# Altium PCB STEP_DRIVER_V3.0.PcbDoc (part 4 of 5)
Units mm, origin at the board's own origin, x right, y up, seen from the top; angles counter-clockwise.
Board outline 245.25 x 200.25 mm, 2 copper layers (Top Layer, Bottom Layer), stack 1.371 mm thick; 477 components, 170 nets, 1104 pads, 876 vias.
Unrouted connection lines stored in the file: 4.
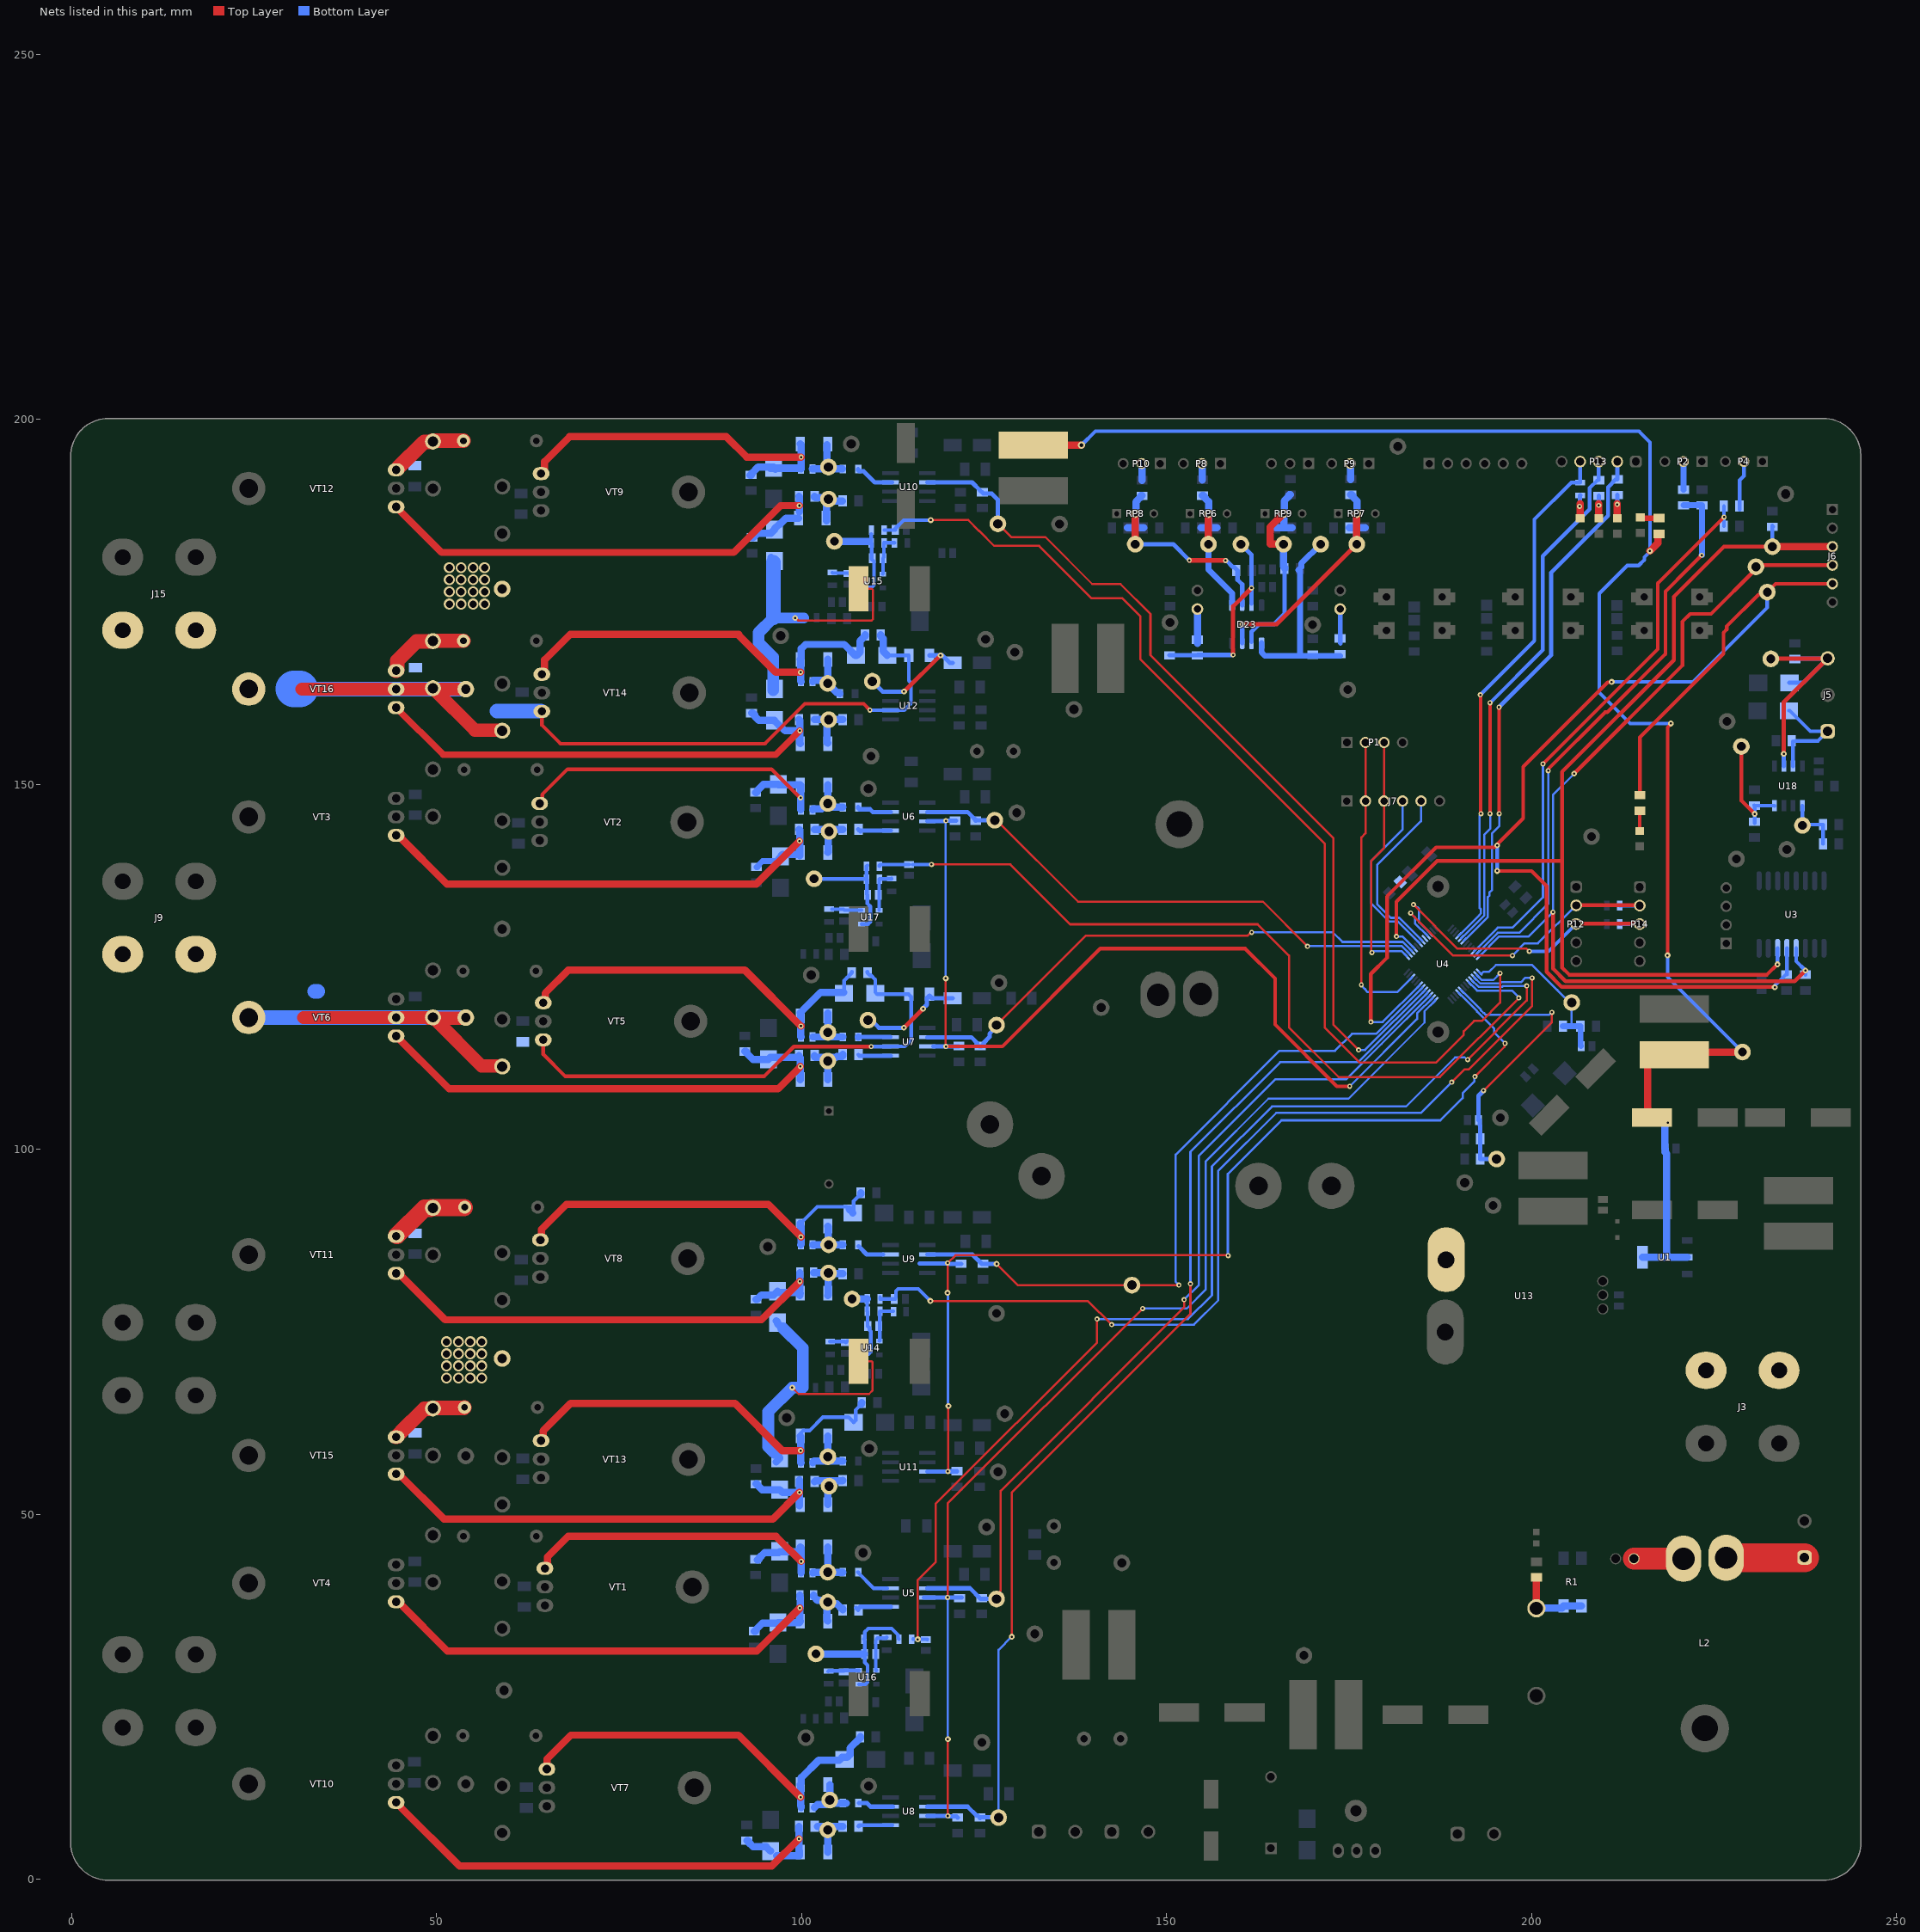
[diagram p3: the nets of this part, all layers, seen from the top]

## Via types
v1: diameter 0.7/0.7 (per signal layer), hole 0.3, Top Layer to Bottom Layer, tented both sides, 388 vias
v2: diameter 1.5/0.7 (per signal layer), hole 1, Top Layer to Bottom Layer, tented both sides, 206 vias
v3: diameter 0.8, hole 0.3, Top Layer to Bottom Layer, tented both sides, 99 vias
v4: diameter 1.5, hole 1, Top Layer to Bottom Layer, 96 vias
v5: diameter 0.5, hole 0.254, Top Layer to Bottom Layer, tented both sides, 42 vias
v6: diameter 1.27, hole 0.711, Top Layer to Bottom Layer, tented both sides, 22 vias
v7: diameter 1.27, hole 0.711, Top Layer to Bottom Layer, 17 vias
v8: diameter 1.27, hole 0.711, Top Layer to Bottom Layer, tented top, 2 vias
v9: diameter 1, hole 0.5, Top Layer to Bottom Layer, 2 vias
v10: diameter 0.7, hole 0.254, Top Layer to Bottom Layer, tented both sides, 2 vias

## Nets (pads, with @x,y where several pads share a name; then routed paths per layer and width w, separated by ;. In a path a pad name is that pad's centre, name@x,y a point inside that pad or via, vN(x,y) a via of type N, cw(c..) or ccw(c..) an arc to the next point about the centre after c; other vN are vias at no path point) (continued)
NetC37_1: C37.1 C79.1 C83.2 J15.2 R139.1 TP64.1 U12.6 VD13.1 VD15.2 VT14.S VT16.D ZD14.1 | length 133.3
  Top Layer w0.5: VT14.S@64.417,160.006 64.44,159.983 64.44,158.11 66.975,155.575 94.983,155.575 100.445,161.037 108.506,161.037 v1(109.368,160.175)
  Top Layer w1: VT14.S@64.417,160.006 VT14.S@64.417,160.006
  Top Layer w1.8: 31.576,163.054 VT16.D@44.451,163.054 VD15.2@49.621,163.054 ; VD15.2@49.5,163.175 VD15.2@49.621,163.054 ; TP64.1@54,163.054 VD15.2@49.621,163.054 ; VD13.1@59,157.35 58.923,157.427 55.248,157.427 VD15.2@49.621,163.054
  Bottom Layer w0.5: v1(109.368,160.175) U12.6@112.204,160.175 114.083,160.175 114.997,161.089 114.997,163.907 114.697,164.207 C37.1@114.697,167.675 ZD14.1@111.75,167.675
  Bottom Layer w1: R139.1@110.819,170.475 110.819,170.324 111.189,169.954 111.189,168.236 ZD14.1@111.75,167.675
  Bottom Layer w2: 31.264,163.054 VT16.D@44.451,163.054 TP64.1@54,163.054 ; 58.262,160.067 VT14.S@64.274,160.067
  Bottom Layer w5: 30.444,163.054 31.264,163.054
NetC37_2: C37.2 D20.1 TP58.1 U12.8 | length 15.6
  Top Layer w0.6: v3(114.047,162.715) 114.065,162.715 119.025,167.675 v3(119.043,167.675)
  Bottom Layer w0.6: TP58.1@109.693,164.125 111.103,162.715 U12.8@112.204,162.715 v3(114.047,162.715) ; C37.2@117.547,167.675 v3(119.043,167.675) 119.295,167.675 120.318,166.652 D20.1@120.718,166.652
NetC41_1: C41.1 C70.1 C72.2 J9.2 R133.1 TP40.1 U7.6 VD6.1 VD8.2 VT5.S VT6.D ZD6.1 | length 134.5
  Top Layer w0.5: VT5.S@64.617,115.006 64.617,113.008 67.625,110 94.87,110 98.945,114.075 v1(109.543,114.075)
  Top Layer w1.8: 31.776,118.054 VT6.D@44.451,118.054 VD8.2@48.825,118.054 ; VD8.2@48.875,117.979 VD8.2@49.596,117.979 ; VD8.2@49.5,118.075 VD8.2@49.596,117.979 ; TP40.1@54.055,117.979 VD8.2@49.596,117.979 ; VD6.1@59,111.35 58.923,111.427 56.148,111.427 VD8.2@49.596,117.979
  Bottom Layer w0.5: R133.1@109.001,124.35 109.001,124.199 109.354,123.846 109.505,123.846 110.1,123.251 ZD6.1@110.1,121.521 ; v1(109.543,114.075) 109.552,114.084 112.195,114.084 U7.6@112.204,114.094 114.134,114.094 115.023,114.982 115.023,120.897 C41.1@114.672,121.248 110.374,121.248 ZD6.1@110.237,121.385
  Bottom Layer w2: VT6.D@24.284,118.028 VT6.D@44.308,118.028 ; 33.314,121.629 33.726,121.629 ; VT6.D@44.472,118.075 C72.2@47.068,118.075 ; C72.2@47.078,118.075 VD8.2@49.5,118.075 ; VD8.2@49.5,118.054 TP40.1@54,118.054
NetC41_2: C41.2 D6.1 TP34.1 U7.8 | length 14.6
  Top Layer w0.6: v3(114.022,116.655) 114.038,116.655 116.633,119.25 v3(116.648,119.25)
  Bottom Layer w0.6: TP34.1@109.093,117.702 109.549,117.702 110.596,116.655 112.183,116.655 U7.8@112.204,116.634 112.215,116.644 114.011,116.644 v3(114.022,116.655) ; v3(116.648,119.25) 116.648,119.304 117.172,119.828 117.172,120.698 117.522,121.048 117.872,120.698 D6.1@120.718,120.698
NetC43_2: C43.2 R53.1 R55.2 TP4.1 U4.13 | length 24.1
  Bottom Layer w0.3: U4.13@192.838,124.299 193.114,124.022 193.117,124.022 193.393,124.299 194.171,124.299 195.122,125.25 200.093,125.25 202.468,122.875 203.518,121.825 TP4.1@205.615,119.728 ; 205.517,116.875 205.517,119.728 TP4.1@205.517,120.125
  Bottom Layer w0.8: R53.1@204.294,116.875 205.517,116.875 206.717,116.875 C43.2@206.717,114.811 ; C43.2@206.718,114.81 206.718,114.226 C43.2@206.793,114.151
NetC44_2: C44.2 R54.1 R56.2 TP5.1 U4.20 | length 40.8
  Top Layer w0.3: v1(193.436,108.058) 202.793,117.415 v1(202.793,118.765)
  Bottom Layer w0.3: U4.20@190.363,121.824 193.038,119.148 193.038,119.067 193.436,118.669 193.518,118.669 193.757,118.429 202.417,118.429 202.753,118.765 v1(202.793,118.765)
  Bottom Layer w0.6: C44.2@192.741,104 C44.2@192.753,104.013 ; C44.2@192.741,104.013 C44.2@192.753,104.013 ; v1(193.436,108.058) 193.436,108.031 192.741,107.336 192.741,104.175 C44.2@192.903,104.013 ; TP5.1@195.229,98.675 192.969,98.675 192.966,98.678 192.966,101.422 192.969,101.425 192.969,103.274 192.916,103.327 192.916,104 C44.2@192.903,104.013 ; C44.2@192.753,104.013 C44.2@192.903,104.013
NetC46_1: C46.1 R69.1 U16.3 | length 4.3
  Bottom Layer w0.5: R69.1@103.655,28.479 103.718,28.542 105.792,28.542 105.855,28.605 105.858,28.603 107.852,28.603 U16.3@107.855,28.6
NetC47_1: C47.1 R70.2 R144.1 U16.4 | length 5.6
  Bottom Layer w0.5: R70.2@110.155,32.628 C47.1@110.155,30.831 110.155,28.675 110.23,28.6 U16.4@110.255,28.6 ; R70.2@110.281,32.9 110.406,33.026 111.542,33.026 R144.1@111.668,33.151
NetC47_2: C47.2 R70.1 R147.2 TP77.1 U16.1 | length 20.5
  Bottom Layer w0.5: TP77.1@101.969,30.875 TP77.1@101.991,30.853 ; U16.1@107.855,26.7 108.762,26.7 109.055,26.993 109.055,29.312 108.657,29.71 C47.2@108.657,30.4 ; R70.1@108.529,32.9 108.657,33.028 108.657,33.866 109.142,34.351 112.352,34.351 113.216,33.487 113.216,33.028 R147.2@113.344,32.9 ; C47.2@108.633,30.853 C47.2@108.655,30.831 ; C47.2@108.655,30.541 C47.2@108.655,30.831 ; R70.1@108.655,32.628 C47.2@108.655,30.831
  Bottom Layer w1: TP77.1@101.991,30.853 C47.2@108.633,30.853
NetC49_1: C49.1 R71.1 U17.3 | length 4.1
  Bottom Layer w0.5: R71.1@104.156,132.895 105.732,132.895 C49.1@105.852,132.775 ; C49.1@105.852,132.773 U17.3@108.227,132.773
NetC50_1: C50.1 R72.2 R143.1 U17.4 | length 6
  Bottom Layer w0.5: U17.4@110.627,132.773 110.64,132.786 110.64,137.006 R72.2@110.654,137.02 110.692,137.057 112.309,137.057 R143.1@112.347,137.095
NetC50_2: C50.2 R72.1 R148.2 TP76.1 U17.1 | length 16.5
  Bottom Layer w0.5: TP76.1@101.718,137.047 108.875,137.047 R72.1@108.901,137.021 ; U17.1@108.227,130.873 109.134,130.873 109.427,131.165 109.427,133.272 109.028,133.671 C50.2@109.028,134.869 108.965,134.932 108.965,136.957 R72.1@108.902,137.02 R72.1@108.901,137.021 ; R148.2@109.027,138.903 R148.2@108.899,138.775 108.901,138.773 R72.1@108.901,137.021
NetC51_1: C51.1 R73.1 U14.3 | length 4.5
  Bottom Layer w0.5: R73.1@103.897,73.676 105.947,73.676 C51.1@106.072,73.55 ; C51.1@106.072,73.555 106.268,73.75 U14.3@108.272,73.75
NetC52_1: C52.1 R62.1 R76.2 U14.4 | length 5.9
  Bottom Layer w0.5: U14.4@110.672,73.75 110.71,73.788 110.71,77.784 R76.2@110.748,77.822 R62.1@112.589,77.822
NetC52_2: C52.2 R76.1 R146.2 TP75.1 U14.1 | length 10.9
  Bottom Layer w0.3: R76.1@108.997,77.822 R76.1@108.998,77.823 ; R146.2@108.998,79.499 R146.2@108.999,79.5
  Bottom Layer w0.5: U14.1@108.272,71.85 108.347,71.925 109.18,71.925 109.472,72.218 109.472,75.047 109.297,75.222 109.297,75.547 C52.2@109.072,75.772 109.035,75.81 109.035,77.784 R76.1@108.997,77.822 ; R76.1@108.998,77.823 R146.2@108.998,79.499
  Bottom Layer w1: TP75.1@106.922,79.5 R146.2@108.999,79.5
NetC53_1: C53.1 R74.1 U15.3 | length 4.6
  Bottom Layer w0.5: R74.1@104.218,179.023 104.281,178.961 106.355,178.961 C53.1@106.418,178.898 108.518,178.898 108.593,178.823 U15.3@108.718,178.823
NetC54_1: C54.1 R77.2 R120.1 U15.4 | length 5.8
  Bottom Layer w0.5: U15.4@111.118,178.823 111.168,178.873 C54.1@111.168,180.993 111.294,181.119 R77.2@111.294,183.093 R120.1@112.717,183.093
NetC54_2: C54.2 R77.1 R145.2 TP74.1 U15.1 | length 13.7
  Bottom Layer w0.3: R77.1@109.335,183.3 R77.1@109.542,183.093
  Bottom Layer w0.5: U15.1@108.718,176.923 108.793,176.998 109.627,176.998 109.92,177.29 109.92,180.54 109.605,180.856 109.605,183.03 R77.1@109.542,183.093 R145.2@109.542,184.319
  Bottom Layer w1: TP74.1@104.501,183.3 R77.1@109.335,183.3
NetC75_2: C75.2 C77.1 C82.2 C84.1 R64.2 R108.2 TP67.1 VD11.1 VD16.1 VT11.S VT15.S ZD13.1 ZD17.1 | length 63.8
  Top Layer w0.3: v3(98.727,67.35) 99.593,66.484 109.252,66.484 109.747,66.979 109.747,70.799 109.572,70.975 R64.2@107.8,70.975
  Top Layer w2: VT15.S@44.451,60.594 44.483,60.594 45.094,61.205 45.094,61.237 48.323,64.466 49.237,64.466 VD16.1@49.34,64.569 ; VD11.1@49.183,91.937 VD11.1@49.271,92.025 ; VD16.1@49.348,64.577 53.752,64.577 C75.2@53.825,64.65 ; C82.2@53.8,92.025 C82.2@53.85,92.075
  Top Layer w2.4: VT11.S@44.594,88.205 48.326,91.937 VD11.1@49.183,91.937 ; VD11.1@49.271,92.025 C82.2@53.8,92.025
  Bottom Layer w1: ZD17.1@96.275,58.423 96.375,58.423 97.025,57.773 ZD17.1@97.025,57.673 ZD17.1@96.514,57.162 ; ZD13.1@96.55,76.5 96.7,76.35 96.7,76.15 97.35,75.5 ZD13.1@97.45,75.5 ; R108.2@100.163,67.35 R108.2@100.167,67.354
  Bottom Layer w1.6: ZD17.1@96.275,58.423 95.439,59.258 95.439,64.062 v3(98.727,67.35) R108.2@100.163,67.35 ; ZD13.1@97.45,75.5 100.167,72.783 R108.2@100.167,67.504
  other v2: 51.368,68.657 52.993,68.657 54.618,68.657 56.193,68.657 51.368,70.332 52.993,70.332 54.618,70.332 56.193,70.332 51.368,71.982 52.993,71.982 54.618,71.982 56.193,71.982 51.368,73.632 52.993,73.632 54.618,73.632 56.193,73.632
NetC76_2: C76.2 C78.1 C80.2 C83.1 R63.2 R110.2 TP68.1 VD12.1 VD15.1 VT12.S VT16.S ZD12.1 ZD16.1 | length 63.8
  Top Layer w0.3: v3(99.118,172.804) 99.198,172.804 99.544,172.458 109.602,172.458 109.778,172.634 109.778,176.637 109.602,176.812 R63.2@107.8,176.812
  Top Layer w2: VT16.S@44.451,165.594 44.483,165.594 44.594,165.705 44.594,166.919 47.262,169.587 49.408,169.587 49.466,169.646 49.466,169.675 C76.2@53.675,169.675 ; VT12.S@44.594,193.205 44.705,193.316 44.705,193.348 48.294,196.937 49.237,196.937 VD12.1@49.275,196.975 ; VD12.1@49.34,197.04 49.367,197.013 49.429,197.075 C80.2@53.675,197.075
  Bottom Layer w1: ZD12.1@95.804,181.096 ZD12.1@96.3,180.6 ZD12.1@96.125,180.425 ; ZD16.1@96.125,162.889 ZD16.1@96.318,163.082
  Bottom Layer w1.5: 96.125,172.804 v3(99.118,172.804) R110.2@100.292,172.804
  Bottom Layer w1.6: ZD16.1@96.125,162.889 96.125,167.425 94.098,169.452 94.098,170.777 96.125,172.804
  Bottom Layer w2: 96.125,172.804 ZD12.1@96.125,180.425
  other v2: 51.743,174.7 53.368,174.7 54.993,174.7 56.568,174.7 51.743,176.375 53.368,176.375 54.993,176.375 56.568,176.375 51.743,178.025 53.368,178.025 54.993,178.025 56.568,178.025 51.743,179.675 53.368,179.675 54.993,179.675 56.568,179.675
NetC91_1: C91.1 C92.1 L5.1 L9.1 R57.2 TP72.1 U1.2 U1.4 | length 237.4
  Top Layer w0.3: L5.1@220.414,112.111 L5.1@221.064,111.461
  Top Layer w0.5: v3(218.65,126.579) 218.65,157.819 219.1,158.269 v3(219.1,158.35)
  Top Layer w1: L9.1@131.754,196.478 v9(138.354,196.478) ; C91.1@215.577,105.175 C91.1@215.917,105.175 ; L5.1@215.9,113.864 215.9,105.192 C91.1@215.917,105.175 ; C91.1@216.066,103.865 C91.1@216.646,104.445 ; C91.1@216.175,104 C91.1@216.175,104.445 ; v3(216.229,181.971) 217.306,183.048 217.306,184.246 217.384,184.324 R57.2@217.483,184.324 ; C91.1@216.35,105.175 C91.1@215.917,105.175 ; C91.1@216.802,105.05 C91.1@217.272,104.92 ; C91.1@217.152,104.8 216.722,104.37 C91.1@216.646,104.445 ; L5.1@219.475,113.325 226.1,113.325 TP72.1@228.9,113.325 ; L5.1@219.564,112.961 L5.1@220.414,112.111 ; C91.1@215.917,105.175 216.621,104.471 C91.1@216.646,104.445
  Bottom Layer w0.5: v9(138.354,196.478) 140.251,198.375 214.725,198.375 216.229,196.871 216.229,181.89 215.46,181.121 215.46,180.76 214.675,179.975 213.112,179.975 209.296,176.159 209.296,162.579 213.525,158.35 v3(219.1,158.35) ; v3(218.65,126.579) 218.65,123.575 TP72.1@228.9,113.325
  Bottom Layer w1: U1.4@215.2,85.225 218.5,85.225 218.861,85.225 ; v3(218.7,103.65) 218.3,103.25 C92.1@218.3,100.1 218.325,100.075 218.325,99.597 218.5,99.422 218.5,85.586 218.861,85.225 ; U1.2@221.35,85.225 218.861,85.225
NetC93_1: C93.1 R146.1 U4.15 | length 133.5
  Top Layer w0.3: v3(117.65,79.225) 139.225,79.225 v1(142.475,75.975) ; v1(189.068,109.2) 190.843,110.975 191.436,110.975 200.093,119.632 v1(200.093,123.476)
  Bottom Layer w0.3: v1(142.475,75.975) 153.75,75.975 157.1,79.325 157.1,97.075 165.025,105 184.868,105 v1(189.068,109.2) ; U4.15@192.13,123.591 193.003,122.719 195.686,122.719 195.867,122.9 198.55,122.9 199.126,123.476 v1(200.093,123.476)
  Bottom Layer w0.5: R146.1@110.751,79.5 C93.1@112.837,79.5 ; C93.1@112.716,79.5 112.941,79.725 112.941,80.582 113.234,80.875 116,80.875 v3(117.65,79.225)
NetC94_1: C94.1 R147.1 U4.16 | length 153.5
  Top Layer w0.3: v3(115.925,32.875) 115.925,40.993 118.367,43.434 118.367,51.417 140.475,73.525 v1(140.475,76.75) ; v1(191.254,112.287) 199.35,120.383 v1(199.35,122.4)
  Bottom Layer w0.3: v1(140.475,76.75) 152.95,76.75 156.225,80.025 156.225,97.65 164.45,105.875 182.818,105.875 189.543,112.6 190.832,112.6 191.146,112.287 v1(191.254,112.287) ; U4.16@191.885,123.127 192.773,122.239 195.958,122.239 196.12,122.4 v1(199.35,122.4)
  Bottom Layer w0.5: R147.1@115.279,32.9 115.304,32.875 v3(115.925,32.875) 117.207,32.875 C94.1@117.232,32.85
NetC95_1: C95.1 R145.1 U4.14 | length 145.7
  Top Layer w0.3: v3(117.7,186.2) 117.725,186.225 122.843,186.225 124.322,184.746 ; 124.343,184.725 126.393,182.675 132.55,182.675 139.728,175.497 143.953,175.497 146.425,173.025 146.425,167.125 171.693,141.857 171.693,116.641 176.459,111.875 186.918,111.875 190.716,115.673 190.716,116.172 192.144,117.6 193.193,117.6 195.692,120.099 v1(195.692,124.121)
  Bottom Layer w0.3: U4.14@192.484,123.945 192.487,123.945 193.234,123.199 194.77,123.199 v1(195.692,124.121)
  Bottom Layer w0.5: R145.1@111.327,184.85 C95.1@112.843,184.85 112.843,185.05 113.993,186.2 v3(117.7,186.2)
NetC96_1: C96.1 R148.1 U4.17 | length 117.4
  Top Layer w0.3: v1(117.817,139.025) 128.6,139.025 136.795,130.83 162.488,130.83 166.775,126.543 166.775,116.693 173.568,109.9 187.451,109.9 198.268,120.717 v1(198.268,120.75)
  Bottom Layer w0.3: U4.17@191.423,122.884 192.553,121.755 197.313,121.755 198.268,120.8 v1(198.268,120.75)
  Bottom Layer w0.5: R148.1@110.651,138.775 110.651,138.897 110.779,139.025 C96.1@114.718,139.025 ; C96.1@115.218,139.025 v1(117.817,139.025)
NetD3_1: D3.1 R6.1 R7.2 TP26.1 | length 7.5
  Bottom Layer w1: R6.1@101.52,146.51 101.616,146.606 101.616,146.641 102.758,146.641 103.258,147.141 TP26.1@103.606,147.141 ; D3.1@103.593,149.939 103.606,149.927 103.606,146.891 R7.2@105.668,146.891
NetD3_2: D3.2 R6.2 R131.2 VT2.G ZD3.2 | length 50
  Top Layer w0.5: VT2.G@64.117,147.386 64.475,147.744 64.475,148.6 67.95,152.075 95.882,152.075 99.706,148.251 99.714,148.251 99.88,148.085 v1@99.88,148.077
  Bottom Layer w0.6: D3.2@99.843,149.939 D3.2@99.88,149.903 ; R6.2@99.88,146.547 R6.2@99.916,146.51
  Bottom Layer w1: R131.2@93.69,148.901 93.841,148.901 93.944,149.004 93.944,149.155 94.786,149.996 96.846,149.996 ZD3.2@96.85,150 ; ZD3.2@96.85,149.939 D3.2@99.843,149.939 ; R6.2@99.88,146.547 D3.2@99.88,149.903
  other v1: 99.868,148.151
NetD4_1: D4.1 R11.1 R14.2 TP25.1 | length 7.6
  Bottom Layer w1: R11.1@101.52,41.968 101.569,42.017 103.544,42.017 TP25.1@103.593,42.065 ; D4.1@103.593,45.524 TP25.1@103.593,42.065 ; R14.2@105.668,42.065 TP25.1@103.593,42.065
NetD4_2: D4.2 R11.2 R127.2 VT1.G ZD1.2 | length 49.3
  Top Layer w0.5: VT1.G@64.834,42.586 VT1.G@65.209,42.96
  Top Layer w0.99: 65.209,43.784 65.209,44.176 68.004,46.971 96.521,46.971 v1(99.949,43.543)
  Top Layer w1: VT1.G@65.209,42.96 65.209,43.784
  Bottom Layer w1: R127.2@93.925,43.726 94.076,43.726 94.179,43.829 94.179,43.98 94.961,44.762 96.894,44.762 97.025,44.893 99.587,44.893 D4.2@99.843,45.149 ; D4.2@99.843,45.524 99.949,45.417 99.949,44.893 v1(99.949,43.543) 99.949,42.001 R11.2@99.916,41.968
NetD5_1: D5.1 R15.1 R16.2 TP30.1 | length 6.9
  Bottom Layer w1: R16.2@101.769,143.843 103.681,143.843 R15.1@105.667,143.843 ; D5.1@103.593,140.668 103.681,140.756 103.681,143.462 TP30.1@103.768,143.55
NetD5_2: D5.2 R16.1 R132.2 VT3.G ZD5.2 | length 70.6
  Top Layer w1: VT3.G@44.871,142.879 51.4,136.35 93.818,136.35 v1(99.718,142.25)
  Bottom Layer w0.8: R132.2@93.818,138.676 93.969,138.676 94.172,138.879 94.172,139.03 94.642,139.5 96.475,139.5 ZD5.2@97.1,140.125
  Bottom Layer w1: ZD5.2@97.169,140.168 97.398,140.397 99.718,140.397 99.768,140.447 D5.2@99.768,140.668 ; R16.1@99.667,143.843 99.755,143.755 D5.2@99.755,140.205
NetD7_1: D7.1 R25.1 R28.2 TP29.1 | length 7.1
  Bottom Layer w1: R28.2@101.669,38.92 101.669,38.719 102.176,38.212 103.347,38.212 TP29.1@103.593,37.966 103.839,37.72 104.844,37.72 105.413,37.151 105.564,37.151 105.667,37.048 R25.1@105.667,36.897 ; TP29.1@103.347,37.326 103.47,37.203 103.47,35.487 D7.1@103.593,35.364
NetD7_2: D7.2 R28.1 R128.2 VT4.G ZD2.2 | length 70.4
  Top Layer w0.99: VT4.G@45.049,37.701 51.496,31.254
  Top Layer w1: 51.496,31.254 93.864,31.254 v1(99.767,37.158)
  Bottom Layer w1: R128.2@93.525,33.975 93.676,33.975 93.779,34.078 93.779,34.229 94.625,35.075 ZD2.2@96.775,35.075 ; ZD2.2@96.775,35.175 99.718,35.175 99.843,35.3 D7.2@99.843,35.364 99.767,35.44 v1(99.767,37.158) ; R28.1@99.767,38.92 99.767,38.719 99.843,38.643 v1@99.843,37.158
NetD8_1: D8.1 R19.1 R21.2 TP36.1 | length 7.4
  Bottom Layer w1: R19.1@101.52,115.4 TP36.1@103.606,115.4 ; D8.1@103.606,118.69 TP36.1@103.606,116.025 TP36.1@103.606,115.4 ; R21.2@105.668,115.4 TP36.1@103.606,115.4
NetD8_2: D8.2 R19.2 R133.2 VT5.G ZD6.2 | length 55.1
  Top Layer w0.5: VT5.G@64.617,120.086 VT5.G@64.875,120.344
  Top Layer w1: VT5.G@64.875,120.344 64.875,121.4 68.037,124.562 92.235,124.562 v1(99.916,116.88)
  Bottom Layer w0.5: D8.2@99.841,118.302 100.216,118.677 D8.2@100.216,119.113 ; ZD6.2@105.8,121.521 105.828,121.55 105.828,123.128 106.244,123.544 106.899,124.199 R133.2@106.899,124.35
  Bottom Layer w1: D8.2@99.843,118.702 99.88,118.666 99.88,116.88 99.88,115.437 R19.2@99.916,115.4 ; D8.2@100.216,119.113 102.625,121.521 ZD6.2@105.8,121.521
NetD9_1: D9.1 R26.1 R27.2 TP42.1 | length 7.3
  Bottom Layer w1: R27.2@101.769,112.86 101.769,112.711 101.872,112.608 103.372,112.608 103.618,112.362 103.864,112.608 104.722,112.608 104.847,112.733 105.564,112.733 105.667,112.836 R26.1@105.667,112.987 ; D9.1@103.593,109.558 TP42.1@103.593,112.337
NetD9_2: D9.2 R27.1 R134.2 VT6.G ZD8.2 | length 71.7
  Top Layer w1: VT6.G@44.1,115.9 51.725,108.275 96.776,108.275 v1(99.843,111.342)
  Bottom Layer w1: R134.2@92.225,113.424 92.376,113.424 92.479,113.321 92.479,113.17 93.324,112.325 ZD8.2@95.45,112.325 95.731,112.606 99.564,112.606 R27.1@99.667,112.709 ; R27.1@99.667,112.86 R27.1@99.667,112.709 ; D9.2@99.843,109.558 v1(99.843,111.342) 99.843,112.533 R27.1@99.667,112.709
NetD13_1: D13.1 R31.1 R34.2 TP35.1 | length 7.4
  Bottom Layer w1: R31.1@101.779,9.8 101.779,9.835 102.201,10.257 103.282,10.257 TP35.1@103.46,10.435 ; D13.1@103.868,12.975 TP35.1@103.868,10.843 TP35.1@103.46,10.435 ; 106.142,10.435 R34.2@105.668,10.435 103.868,10.435 TP35.1@103.46,10.435
NetD13_2: D13.2 R31.2 R129.2 VT7.G ZD7.2 | length 55.9
  Top Layer w0.99: VT7.G@65.117,15.086 65.117,16.467 68.4,19.75 91.361,19.75 v1(99.868,11.243)
  Bottom Layer w1: D13.2@99.843,12.975 99.968,13.1 99.968,13.92 102.355,16.307 105.157,16.307 105.55,16.7 106.267,16.7 106.649,17.082 106.649,17.975 108.048,19.374 R129.2@108.048,19.525 ; D13.2@99.868,12.668 v1(99.868,11.243) 99.868,10.079 99.916,10.031 R31.2@99.916,9.8
NetD14_1: D14.1 R41.1 R43.2 TP49.1 | length 6.8
  Bottom Layer w1: R41.1@101.52,86.922 101.718,86.922 101.722,86.927 103.713,86.927 TP49.1@103.715,86.929 TP49.1@103.717,86.931 ; D14.1@103.593,89.477 103.655,89.415 103.655,86.993 TP49.1@103.717,86.931 ; R43.2@105.668,86.922 105.664,86.927 103.722,86.927 TP49.1@103.717,86.931
NetD14_2: D14.2 R41.2 R135.2 VT8.G ZD10.2 | length 54.5
  Top Layer w0.5: VT8.G@64.217,87.586 VT8.G@64.386,87.755
  Top Layer w1: VT8.G@64.386,87.755 64.386,89.061 67.8,92.475 95.438,92.475 v1(99.916,87.997)
  Bottom Layer w0.5: D14.2@99.843,89.852 102.141,92.15 ZD10.2@106.175,92.15 ; ZD10.2@107.025,91.3 107.132,91.407 107.132,92.907 R135.2@108.124,93.899
  Bottom Layer w1: D14.2@99.843,89.852 D14.2@99.843,89.477 99.916,89.404 v1(99.916,87.997) 99.916,86.97 R41.2@99.868,86.922 ; ZD10.2@106.514,91.811 ZD10.2@107.025,91.3 ; R135.2@108.124,93.899 R135.2@108.124,94.05
NetD15_1: D15.1 R42.1 R44.2 TP50.1 | length 7
  Bottom Layer w1: R42.1@101.464,193.262 TP50.1@103.015,193.262 ; D15.1@103.468,196.55 103.468,195.592 103.468,193.262 R44.2@105.618,193.262
NetD15_2: D15.2 R42.2 R136.2 VT9.G ZD11.2 | length 54.8
  Top Layer w0.5: VT9.G@64.317,192.586 VT9.G@64.798,193.067
  Top Layer w1: VT9.G@64.798,193.067 64.798,194.225 68.208,197.635 89.69,197.635 92.475,194.85 v1(99.943,194.85)
  Bottom Layer w1: R136.2@92.938,192.378 93.089,192.378 93.192,192.482 93.192,192.633 94.037,193.478 95.688,193.478 ZD11.2@96.188,193.478 ; ZD11.2@95.688,193.265 R42.2@99.82,193.265 ; ZD11.2@96.188,193.337 99.82,193.337 99.916,193.241 R42.2@99.916,193.206 ; ZD11.2@96.188,193.405 ZD11.2@96.426,193.167 ; D15.2@99.843,196.635 99.943,196.535 v1(99.943,194.85) R42.2@99.943,193.521
NetD16_1: D16.1 R45.1 R48.2 TP8.1 | length 7.3
  Bottom Layer w1: R48.2@102.155,7.26 TP8.1@103.868,7.26 ; D16.1@103.593,3.704 103.593,7.26 R45.1@105.667,7.26
NetD16_2: D16.2 R48.1 R130.2 VT10.G ZD9.2 | length 71.5
  Top Layer w0.5: VT10.G@44.451,10.514 44.494,10.514 45.094,9.914 VT10.G@45.094,9.871
  Top Layer w0.99: VT10.G@45.094,9.871 53.15,1.815 95.932,1.815 v1(99.667,5.55)
  Bottom Layer w1: R130.2@92.509,5.305 92.66,5.305 92.763,5.202 92.763,5.051 93.373,4.442 95.157,4.442 ZD9.2@95.743,3.856 ; ZD9.2@96.6,3.239 99.718,3.239 D16.2@99.718,3.859 ; D16.2@99.667,3.859 v1(99.667,5.55) R48.1@99.667,7.26
NetD17_1: D17.1 R51.1 R59.2 TP53.1 | length 7.2
  Bottom Layer w1: R59.2@101.669,83.119 101.669,83.077 101.672,83.074 103.672,83.074 TP53.1@103.694,83.051 TP53.1@103.717,83.028 ; D17.1@103.593,79.944 103.655,80.006 103.655,82.966 TP53.1@103.717,83.028 ; R51.1@105.667,82.965 105.635,82.996 103.749,82.996 TP53.1@103.717,83.028
NetD17_2: D17.2 R59.1 R138.2 VT11.G ZD13.2 | length 70
  Top Layer w0.5: VT11.G@44.451,83.014 VT11.G@44.811,83.014
  Top Layer w0.99: VT11.G@44.811,83.014 51.175,76.65 94.509,76.65 v1(99.767,81.908)
  Bottom Layer w1: R138.2@93.75,79.451 93.901,79.451 94.504,80.054 96.204,80.054 ZD13.2@96.7,80.55 96.837,80.412 99.718,80.412 D17.2@99.767,80.363 ; D17.2@99.767,79.944 D17.2@99.767,80.363 ; R59.1@99.767,83.119 v1(99.767,81.908) D17.2@99.767,80.363 ; D17.2@99.843,80.275 99.843,80.288 D17.2@99.767,80.363
NetD18_1: D18.1 R52.1 R60.2 TP54.1 | length 6.4
  Bottom Layer w1: R60.2@101.767,189.456 101.767,189.375 101.87,189.272 103.374,189.272 103.442,189.204 TP54.1@103.442,189.088 ; 103.406,187.906 TP54.1@103.406,188.719 ; D18.1@103.435,186.122 103.435,187.806 ; TP54.1@103.693,188.822 104.126,188.822 R52.1@105.614,188.822
NetD18_2: D18.2 R60.1 R137.2 VT12.G ZD12.2 | length 70.1
  Top Layer w0.99: VT12.G@44.451,188.014 50.685,181.78 90.705,181.78 97.127,188.202 v1(99.699,188.202)
  Bottom Layer w1: R137.2@93.225,183.801 93.376,183.801 93.979,184.404 95.804,184.404 ZD12.2@96.3,184.9 96.3,185 96.95,185.65 97.05,185.65 97.875,186.475 D18.2@99.593,186.475 ; R60.1@99.665,189.456 99.699,189.422 v1(99.699,188.202) D18.2@99.699,187.364
NetD21_1: D21.1 R65.1 R75.2 TP59.1 | length 7.4
  Bottom Layer w1: R65.1@101.52,57.036 101.52,57.071 101.739,57.29 103.606,57.29 R75.2@105.668,57.29 ; D21.1@103.593,60.719 103.606,60.707 103.606,57.587 TP59.1@103.618,57.575
NetD21_2: D21.2 R65.2 R140.2 VT13.G ZD15.2 | length 56.7
  Top Layer w0.5: VT13.G@64.317,60.086 VT13.G@64.605,60.374
  Top Layer w1: VT13.G@64.605,60.374 64.605,61.43 68.375,65.2 90.875,65.2 97.357,58.718 v1(99.88,58.718)
  Bottom Layer w0.5: D21.2@99.843,60.719 99.843,61.094 100.218,61.469 101.093,61.469 102.931,63.307 106.436,63.307 ZD15.2@107.143,62.6 107.413,62.87 107.413,64.291 R140.2@108.168,65.046
  Bottom Layer w1: D21.2@99.843,60.719 99.88,60.683 v1(99.88,58.718) 99.88,57.073 R65.2@99.916,57.036 ; R140.2@108.168,65.046 108.168,65.197 R140.2@108.272,65.3
NetD22_1: D22.1 R57.1 | length 2.4
  Top Layer w0.8: D22.1@215.079,186.466 217.489,186.466 R57.1@217.491,186.468
NetD23_1: D23.1 R90.2 R92.2 TP16.1 | length 28.9
  Bottom Layer w0.8: D23.1@163.031,169.341 163.031,168.076 163.499,167.608 168.406,167.608 ; TP16.1@171.115,182.914 168.483,180.282 168.483,179.765 168.076,179.358 168.129,179.358 168.279,179.207 168.279,167.734 168.406,167.608 ; R90.2@173.782,167.608 170.023,167.608 168.406,167.608
NetD23_2: D23.2 R84.1 RP9.2 TP22.1 | length 30.5
  Top Layer w1: TP22.1@166.035,182.914 164.185,182.914 164.185,185.255 RP9.2@166.035,187.105
  Bottom Layer w0.6: D23.2@161.641,169.538 161.641,170.921 162.661,171.941 164.736,171.941 166.178,173.383 R84.1@166.178,179.561
  Bottom Layer w1: 164.977,185.149 166.086,185.149 ; TP22.1@166.035,182.914 166.035,179.855 166.178,179.712 R84.1@166.178,179.561 ; 166.975,189.687 166.824,189.687 166.721,189.583 166.721,189.432 166.124,188.836 166.124,187.093 166.086,187.054 166.086,185.149 ; 167.194,185.149 166.086,185.149
NetD23_3: D23.3 R88.1 RP7.2 TP20.1 | length 36.5
  Top Layer w0.6: v3(160.371,171.941) 161.462,171.941 165.095,171.941 TP20.1@176.068,182.914
  Top Layer w1: TP20.1@176.068,182.914 RP7.2@176.068,187.105
  Bottom Layer w0.6: D23.3@160.371,169.341 v3(160.371,171.941)
  Bottom Layer w1: R88.1@175.016,185.155 175.01,185.149 176.068,185.149 ; 175.23,189.687 175.38,189.687 175.484,189.583 175.484,189.432 176.08,188.836 176.08,187.093 RP7.2@176.068,187.105 176.068,185.149 ; TP20.1@176.068,182.914 176.068,185.149 ; 177.227,185.149 177.221,185.155 177.215,185.149 176.068,185.149
NetD23_5: D23.5 RP6.2 TP19.1 | length 21.3
  Top Layer w1: TP19.1@155.748,182.677 155.511,182.677 TP19.1@155.748,182.914 RP6.2@155.748,187.105
  Bottom Layer w0.8: TP19.1@155.748,182.914 155.748,179.411 158.981,176.178 D23.5@158.981,174.795
  Bottom Layer w1: 154.69,185.149 155.799,185.149 ; 154.91,189.594 155.06,189.594 155.164,189.491 155.164,189.34 155.76,188.744 155.76,187.093 155.799,187.054 155.799,185.149 ; 156.907,185.149 155.799,185.149
NetD23_6: D23.6 R83.1 RP8.2 TP21.1 | length 32.3
  Top Layer w0.6: v1(153.132,180.704) 153.146,180.69 158.08,180.69 v1(158.095,180.675)
  Top Layer w1: TP21.1@145.469,182.668 TP21.1@145.715,182.914 RP8.2@145.715,187.105
  Bottom Layer w0.6: TP21.1@145.455,182.914 TP21.1@145.715,182.914 150.922,182.914 v1(153.132,180.704) ; v1(158.095,180.675) 158.133,180.637 158.244,180.637 159.12,179.762 159.271,179.762 159.732,179.3 159.732,178.035 160.371,177.396 D23.6@160.371,174.541
  Bottom Layer w1: 144.657,185.149 146.874,185.149 ; 145.766,185.243 145.766,187.054 145.804,187.093 145.804,188.709 146.401,189.305 146.401,189.456 146.504,189.56 146.655,189.56
NetD23_7: D23.7 R89.2 R91.2 TP15.1 | length 27.7
  Top Layer w0.6: v1(159.13,167.732) 159.13,174.384 v1(161.641,176.894)
  Bottom Layer w0.6: R91.2@150.414,167.697 R89.2@154.224,167.697 ; R89.2@154.259,167.732 v1(159.13,167.732) ; TP15.1@160.193,182.809 TP15.1@160.193,182.914 161.641,181.466 v1(161.641,176.894) D23.7@161.641,174.795
NetD24_1: D24.1 R68.1 R78.2 TP60.1 | length 7.3
  Bottom Layer w1: R68.1@101.52,164.082 101.52,164.117 101.662,164.259 103.593,164.259 D24.1@103.593,167.13 ; TP60.1@103.593,163.84 104.897,162.536 105.193,162.536 105.193,162.486 R78.2@105.243,162.436
NetD24_2: D24.2 R68.2 R139.2 VT14.G ZD14.2 | length 57
  Top Layer w0.5: VT14.G@64.417,165.086 VT14.G@64.8,165.469 ; 91.395,170.425 91.4,170.425
  Top Layer w1: VT14.G@64.8,165.469 64.8,167.061 68.289,170.55 91.4,170.55 ; 91.4,170.425 96.475,165.35 v1(99.868,165.35)
  Bottom Layer w1: R68.2@99.916,164.082 99.88,164.119 99.88,167.094 D24.2@99.843,167.13 99.968,167.255 99.968,168.589 100.554,169.175 105.85,169.175 107.35,167.675 ZD14.2@107.45,167.675 ; ZD14.2@107.55,167.675 108.011,168.136 108.011,169.635 108.597,170.221 108.614,170.221 108.717,170.324 R139.2@108.717,170.475
NetD25_1: D25.1 R103.1 R105.2 TP65.1 | length 6.5
  Bottom Layer w1: R105.2@101.769,54.457 101.872,54.56 TP65.1@103.606,54.56 ; D25.1@103.593,51.321 103.606,51.334 103.606,53.859 TP65.1@103.618,53.871 ; TP65.1@103.618,54.56 105.604,54.56 R103.1@105.667,54.623
NetD25_2: D25.2 R105.1 R142.2 VT15.G ZD17.2 | length 69.3
  Top Layer w1: VT15.G@44.451,55.514 44.855,55.514 51.019,49.35 96.066,49.35 v1(99.716,53)
  Bottom Layer w1: R142.2@93.75,54.147 93.901,54.147 94.004,54.043 94.004,53.958 94.59,53.373 ZD17.2@97.025,53.373 97.398,53 v1(99.716,53) ; R105.1@99.714,54.689 99.716,54.688 v1(99.716,53) ; D25.2@99.718,51.19 99.718,52.998 v1(99.716,53)
NetD26_1: D26.1 R104.1 R106.2 TP66.1 | length 6.9
  Bottom Layer w1: R106.2@101.769,158.871 R104.1@105.667,158.871 ; TP66.1@103.501,158.617 103.501,155.722 D26.1@103.568,155.654
NetD26_2: D26.2 R106.1 R141.2 VT16.G ZD16.2 | length 70.5
  Top Layer w0.9: VT16.G@44.451,160.514 50.915,154.05 96.468,154.05 v1(99.768,157.35)
  Bottom Layer w1: R141.2@93.143,159.782 93.294,159.782 93.557,159.519 93.557,159.368 94.142,158.782 ZD16.2@96.318,158.782 96.318,158.682 96.968,158.032 97.068,158.032 97.75,157.35 v1(99.768,157.35) ; R106.1@99.667,158.871 99.768,158.771 v1(99.768,157.35) ; D26.2@99.843,155.569 99.768,155.644 v1(99.768,157.35)
NetD28_1: D28.1 R123.1 | length 2.8
  Top Layer w0.5: D28.1@214.825,143.609 214.825,146.349 R123.1@214.85,146.374
NetD29_1: D29.1 R113.1 | length 3.5
  Top Layer w1: D29.1@206.675,186.45 206.675,188.448
  Bottom Layer w0.6: v1(206.595,188.107) 206.633,188.145 206.633,189.563 R113.1@206.675,189.604
NetD30_1: D30.1 R114.1 | length 3.3
  Top Layer w1: D30.1@209.215,186.45 v1@209.215,188.448
  Bottom Layer w0.6: v1(209.215,188.23) R114.1@209.215,189.527
NetD31_1: D31.1 R115.1 | length 3.3
  Top Layer w1: D31.1@211.755,186.45 v1@211.755,188.448
  Bottom Layer w0.6: v1(211.755,188.352) R115.1@211.755,189.649
NetJ2_1: J2.1 L2.2 | length 10.7
  Top Layer w4: L2.2@226.671,44.043 J2.1@237.4,44.043
NetJ3_2: J3.2 U13.4
NetJ5_1: J5.1 R124.2 U18.7 ZD19.2 | length 14.8
  Bottom Layer w0.5: ZD19.2@235.275,160.1 235.375,160.1 238.2,157.275 J5.1@240.575,157.275 239.264,155.964 R124.2@236.16,155.964 ; U18.7@235.835,152.487 R124.2@235.835,155.897
NetJ5_3: J5.3 R3.1 TP11.1 U18.6 ZD18.2 | length 36.1
  Top Layer w0.6: TP11.1@232.799,167.199 232.837,167.237 J5.3@240.537,167.237 ; v3(234.566,154.175) 234.566,161.266 J5.3@240.537,167.237 ; J5.3@240.575,167.275 J5.3@240.537,167.237
  Bottom Layer w0.6: U18.6@234.565,152.487 v3@234.566,154.175 ; ZD18.2@235.35,163.925 237.225,163.925 J5.3@240.537,167.237 ; R3.1@236.092,167.199 236.129,167.237 J5.3@240.537,167.237 ; J5.3@240.575,167.275 J5.3@240.537,167.237
NetJ6_3: J6.3 R4.1 TP32.1 U3.6 U4.40 | length 150.8
  Top Layer w0.5: v1(181.508,129.18) 181.485,129.203 181.485,133.919 187.083,139.518 204.2,139.518 ; TP32.1@233,182.57 226.368,182.57 219.502,175.704 219.502,167.027 204.2,151.725 204.2,139.518 ; v3(233.7,125.35) 232.275,123.925 205.173,123.925 204.2,124.898 204.2,139.518
  Top Layer w1: TP32.1@233,182.57 J6.3@241.225,182.57
  Bottom Layer w0.3: v1(181.508,129.18) 181.516,129.171 182.308,129.171 U4.40@183.999,127.48
  Bottom Layer w0.5: TP32.1@233,182.381 TP32.1@233,182.57 R4.1@233,185.299 ; v3(233.7,125.35) 233.71,125.36 233.71,127.54 U3.6@233.72,127.55 ; R4.1@233,185.299 233,185.45 233.151,185.299 R4.1@233,185.299
NetJ6_4: J6.4 R5.1 TP10.1 U3.4 U4.12 | length 131.5
  Top Layer w0.5: v1(202.95,132.5) 202.95,124.748 204.668,123.03 236.056,123.03 v3(237.53,124.504) ; v3(205.85,151.475) 220.675,166.3 220.675,172.3 221.74,173.365 224.615,173.365 230.757,179.507 TP10.1@230.757,179.815 230.972,180.03 J6.4@241.225,180.03
  Bottom Layer w0.3: U4.12@192.838,126.42 195.587,129.169 199.064,129.169 199.619,129.169 v1(202.95,132.5) 202.95,148.575 v3(205.85,151.475)
  Bottom Layer w0.5: U3.4@236.26,127.55 236.26,125.774 v3(237.53,124.504) R5.1@237.53,123.901
NetJ6_5: J6.5 R123.2 R126.2 TP9.1 U3.5 U4.31 | length 207.9
  Top Layer w0.5: v1(177.993,117.45) 177.993,124.025 180.212,126.244 180.212,134.644 186.938,141.37 194.949,141.37 195.219,141.64 v3(195.3,141.64) ; v3@195.165,141.64 198.875,145.35 198.875,152.425 210.435,163.985 210.93,163.985 v3(210.987,164.043) ; v3(195.3,138.15) 200.006,138.15 202.075,136.081 202.075,124.318 204.143,122.25 233.281,122.25 v3(233.331,122.2) ; R123.2@214.85,148.526 214.85,156.45 226.31,167.91 226.31,170.786 226.745,171.22 226.745,171.641 231.104,176.001 231.96,176.001 233.449,177.49 J6.5@241.225,177.49 ; TP9.1@232.302,177.098 TP9.1@232.303,177.096
  Bottom Layer w0.3: v1(177.993,117.45) 179.625,117.45 U4.31@184.706,122.531
  Bottom Layer w0.5: v3(195.3,138.15) v3(195.3,141.64) ; v3(210.987,164.043) 222.118,164.043 232.302,174.227 TP9.1@232.302,176.342 ; v3(233.331,122.2) 233.389,122.257 233.389,122.489 234.839,123.939 234.99,123.939 U3.5@234.99,127.55
NetJ7_2: J7.2 P1.2 U4.34 | length 41.8
  Top Layer w0.3: v1(176.693,122.55) 176.693,142.74 177.253,143.3 J7.2@177.253,147.725 177.253,155.216 P1.2@176.828,155.641
  Bottom Layer w0.3: v1(176.693,122.55) 176.693,122.442 177.194,121.941 177.194,121.923 177.567,121.55 181.604,121.55 U4.34@183.645,123.591
NetJ7_3: J7.3 P1.3 U4.37 | length 34.9
  Top Layer w0.3: v1(178.138,126.95) 178.061,127.026 178.061,139.53 179.793,141.262 J7.3@179.793,147.725 179.793,155.216 179.569,155.44 179.569,155.524 P1.3@179.793,155.748
  Bottom Layer w0.3: v1(178.138,126.95) 178.246,126.95 178.421,127.125 182.233,127.125 U4.37@182.938,126.42
NetJ7_4: J7.4 U4.42 | length 24.8
  Bottom Layer w0.3: J7.4@182.333,147.725 182.333,143.802 178.018,139.487 178.018,133.695 180.52,131.193 181.7,131.193 U4.42@184.706,128.188
NetJ7_5: J7.5 U4.43 | length 24.9
  Bottom Layer w0.3: J7.5@184.873,147.725 184.873,144.97 178.858,138.955 178.858,133.597 180.737,131.718 181.883,131.718 U4.43@185.059,128.541
NetJ12_1: J12.1 L2.1 | length 6.8
  Top Layer w3: J12.1@214.033,43.916 L2.1@220.829,43.916
NetLED3_2: LED3.2 R89.1 | length 4.9
  Bottom Layer w1: LED3.2@154.062,174.024 LED3.2@154.224,174.024 154.275,173.973 R89.1@154.275,169.309
NetLED4_2: LED4.2 R90.1 | length 4.7
  Bottom Layer w0.6: LED4.2@173.782,174.024 173.807,173.999 173.807,169.335 173.833,169.309
NetP2_2: P2.2 R20.2 | length 3.9
  Bottom Layer w0.8: R20.2@220.82,190.351 P2.2@220.82,194.225
NetP4_2: P4.2 R38.2 | length 6.8
  Bottom Layer w0.5: R38.2@228.525,187.646 228.525,191.67 229.11,192.255 P4.2@229.11,194.225
NetP8_2: P8.2 R85.2 | length 2.6
  Bottom Layer w1: P8.2@154.859,193.663 P8.2@154.859,193.963 154.91,193.912 154.91,191.696
NetP9_2: P9.2 R86.2 | length 2.2
  Bottom Layer w1: P9.2@175.179,193.963 175.204,193.938 175.204,191.814 175.23,191.788
NetP10_2: P10.2 R97.2 | length 2.3
  Bottom Layer w1: P10.2@146.604,193.963 146.629,193.938 146.629,191.687 146.655,191.661
NetP12_2: P12.2 P14.2 R61.2 U4.45 | length 43.1
  Top Layer w0.3: v1(183.442,132.385) 189.277,126.55 v1(197.393,126.55)
  Top Layer w0.5: P12.2@206.5,133.46 P14.2@214.834,133.46
  Bottom Layer w0.3: v1(183.442,132.385) 184.043,131.784 184.043,130.972 U4.45@185.767,129.248 ; v1(197.393,126.55) 199.068,128.225 200.885,128.225 P12.2@206.1,133.44
  Bottom Layer w0.5: R61.2@212.076,133.399 P14.2@214.834,133.399
NetP12_3: P12.3 P14.3 R58.2 U4.46 | length 43.3
  Top Layer w0.3: v1(183.821,133.525) 189.865,127.48 199.317,127.48 199.673,127.125 v1(199.693,127.125)
  Top Layer w0.5: P12.3@206.1,130.915 P14.3@214.834,130.915 ; P14.3@214.74,130.765 P14.3@214.834,130.859
  Bottom Layer w0.3: v1(183.821,133.525) 183.929,133.525 184.288,133.166 184.381,133.166 184.593,132.954 184.593,131.129 U4.46@186.12,129.602
  Bottom Layer w0.5: v1(199.693,127.125) 202.325,127.125 P12.3@206.1,130.9 ; R58.2@212.177,130.96 R58.2@212.076,130.859 P14.3@214.834,130.859
NetP13_2: P13.2 R115.2 U4.6 | length 74.5
  Top Layer w0.3: v1(195.55,160.575) v1@195.57,160.555 ; v1@195.57,146.164 195.627,146.107 v1@195.627,146.034
  Top Layer w0.5: v1@195.57,146.164 v1@195.57,160.555
  Bottom Layer w0.3: U4.6@190.716,128.541 194.031,131.856 194.031,134.551 194.228,134.747 194.228,135.165 194.57,135.507 194.57,143.277 195.622,144.329 195.622,145.929 v1(195.572,145.979)
  Bottom Layer w0.58: v1(195.55,160.575) 202.67,167.695 202.67,178.995 210.501,186.826 210.501,190.723 211.579,191.801 R115.2@211.755,191.801 P13.2@211.755,194.217
NetP13_3: P13.3 R114.2 U4.5 | length 73.3
  Top Layer w0.3: v1@194.321,146.021 v1@194.343,146 ; v1@194.321,161.171 v1(194.325,161.175)
  Top Layer w0.5: v1@194.321,146.021 v1@194.321,161.171
  Bottom Layer w0.3: U4.5@190.363,128.895 193.547,132.079 193.547,143.129 194.368,143.95 194.368,145.925 v1(194.318,145.975)
  Bottom Layer w0.5: v1(194.325,161.175) 201.545,168.395 201.545,181.275 207.961,187.691 207.961,190.6 209.039,191.679 R114.2@209.215,191.679 ; R114.2@209.215,191.679 P13.3@209.215,194.217
NetP13_4: P13.4 R113.2 U4.4 | length 72.7
  Top Layer w0.3: v1(193,162.275) v1@193.034,162.241 ; v1@193.034,146.109 v1@193.118,146.025
  Top Layer w0.5: v1@193.034,146.109 v1@193.034,162.241
  Bottom Layer w0.3: U4.4@190.009,129.248 192.91,132.149 192.91,132.177 193.067,132.334 193.067,132.903 192.91,133.06 192.91,145.709 193.068,145.867 v1(193.068,145.975)
  Bottom Layer w0.5: v1(193,162.275) 200.4,169.675 200.4,186.305 205.451,191.356 R113.2@206.675,191.356 P13.4@206.675,194.217
NetR1_1: R1.1 R121.2 VD17.1 | length 10.6
  Top Layer w1: VD17.1@200.675,37.125 R121.2@200.675,41.349
  Bottom Layer w1: VD17.1@200.675,37.125 204.175,37.125 204.4,37.35 R1.1@204.4,37.45 R1.1@206.85,37.45
NetR2_2: R2.2 U4.44
NetR7_1: R7.1 U6.7 | length 4.8
  Bottom Layer w0.6: R7.1@107.768,146.891 107.768,146.741 107.918,146.591 109.377,146.591 109.748,146.22 U6.7@112.204,146.22
NetR8_1: R8.1 R122.1 TP31.1 U18.1 | length 8.1
  Bottom Layer w0.5: U18.1@237.105,147.063 237.12,147.048 237.12,144.066 TP31.1@237.136,144.051 ; TP31.1@237.43,144.379 237.55,144.499 R122.1@239.947,144.499 ; R8.1@239.947,141.851 R122.1@239.947,144.379
NetR9_1: R9.1 R119.1 TP7.1 U18.4 | length 15.2
  Top Layer w0.5: TP7.1@228.75,155.2 228.75,147.779 v3(230.575,145.954)
  Bottom Layer w0.5: R9.1@230.511,147.138 R9.1@230.55,147.099 ; R119.1@230.575,144.701 v3(230.575,145.954) 230.575,147.074 R9.1@230.55,147.099 ; U18.4@233.295,147.063 233.259,147.099 R9.1@230.55,147.099
NetR12_2: R12.2 TP27.1 U4.27 U5.2 | length 123.1
  Top Layer w0.3: TP27.1@126.718,38.401 126.718,38.938 127.293,39.513 127.293,53.218 152.418,78.343 v1(152.418,79.4)
  Bottom Layer w0.3: v1(152.418,79.4) 154.4,81.382 154.4,99.075 164.9,109.575 174.579,109.575 179.456,114.452 U4.27@186.12,121.117
  Bottom Layer w0.6: U5.2@117.232,39.866 123.077,39.866 124.542,38.401 TP27.1@126.718,38.401
NetR13_2: R13.2 R24.2 U4.26 U6.3 U7.3 | length 127.6
  Top Layer w0.3: v3(119.75,123.425) 119.759,123.416 119.759,114.103 v1(119.768,114.094)
  Top Layer w0.5: v1(119.768,114.094) 127.521,114.094 140.927,127.5 160.775,127.5 164.868,123.407 164.868,117.106 173.332,108.642 175.087,108.642 v1(175.097,108.632)
  Bottom Layer w0.3: v3(119.75,123.425) 119.76,123.435 119.76,145 v1(119.77,145.01) ; v1(175.097,108.632) 184.332,117.868 184.332,118.621 U4.26@186.474,120.763
  Bottom Layer w0.6: U6.3@117.232,144.95 119.683,144.95 119.743,145.01 v1(119.77,145.01) R13.2@121.151,145.01 ; U7.3@118.067,114.094 v1(119.768,114.094) 119.785,114.111 121.516,114.111 R24.2@121.533,114.094
NetR14_1: R14.1 U5.7 | length 5
  Bottom Layer w0.5: R14.1@107.768,42.065 107.677,42.065 109.876,39.866 U5.7@111.725,39.866
NetR15_2: R15.2 U6.5 | length 4.9
  Bottom Layer w0.6: R15.2@108.072,143.54 107.769,143.843 107.932,143.68 U6.5@112.204,143.68
NetR17_2: R17.2 TP28.1 U4.38 U6.2 | length 73.7
  Top Layer w0.3: TP28.1@126.718,145.1 137.893,133.925 163.218,133.925 v1(169.318,127.825)
  Bottom Layer w0.3: v1(169.318,127.825) 169.327,127.834 182.231,127.834 U4.38@183.292,126.773
  Bottom Layer w0.6: U6.2@117.232,146.22 122.728,146.22 123.668,145.28 123.784,145.28 R17.2@123.972,145.092 ; R17.2@123.849,145.082 R17.2@123.857,145.091 ; R17.2@123.857,145.01 123.939,145.092 R17.2@123.972,145.092 ; TP28.1@126.159,145.092 R17.2@123.972,145.092
NetR18_2: R18.2 R40.2 U4.25 U5.3 U8.3 | length 158.8
  Top Layer w0.3: v1(120.018,38.6) 120.018,51.5 v1(146.718,78.2) ; v1@120.046,8.678 v3@120.046,19.196
  Top Layer w0.5: v1(120.043,8.674) v1@120.046,8.678 ; v3@120.046,19.196 v3(120.05,19.2)
  Bottom Layer w0.3: v3@120.034,19.216 v1@120.034,38.584 ; v1(146.718,78.2) 152.775,78.2 155.35,80.775 155.35,98.335 163.965,106.95 174.926,106.95 185.348,117.372 185.348,118.93 U4.25@186.827,120.409
  Bottom Layer w0.5: v1(120.018,38.6) v1@120.034,38.584 ; v3@120.034,19.216 v3(120.05,19.2)
  Bottom Layer w0.6: U5.3@116.752,38.596 U5.3@117.232,38.596 117.234,38.598 120.016,38.598 v1(120.018,38.6) R18.2@121.931,38.6 ; U8.3@117.232,8.674 v1(120.043,8.674) 120.081,8.636 121.206,8.636 R40.2@121.386,8.455
NetR20_1: R20.1 R22.1 U4.11 | length 78.7
  Top Layer w0.5: v1(202.3,151.875) 202.338,151.913 202.338,152.138 210.088,159.888 210.388,159.888 218.362,167.862 218.362,176.437 221.506,179.581 v1(223.325,181.4)
  Bottom Layer w0.3: U4.11@192.484,126.773 195.388,129.677 197.921,129.677 198.327,129.677 202.3,133.65 v1(202.3,151.875)
  Bottom Layer w0.8: R20.1@220.82,188.249 223.36,188.249 223.36,181.435 v1(223.325,181.4)
NetR21_1: R21.1 U7.7 | length 4.4
  Bottom Layer w0.6: R21.1@107.786,115.382 U7.7@112.186,115.382
  Bottom Layer w1: R21.1@107.768,115.4 R21.1@107.786,115.382
NetR23_2: R23.2 TP37.1 U4.28 U8.2 | length 153.4
  Top Layer w0.3: v3(128.8,33.225) 128.8,52.975 153.275,77.45 v1(153.275,81.575)
  Bottom Layer w0.3: TP37.1@126.993,8.775 126.993,31.418 v3(128.8,33.225) ; v1(153.275,81.575) 153.275,99.65 165.575,111.95 176.246,111.95 U4.28@185.767,121.47
  Bottom Layer w0.6: U8.2@117.232,9.944 122.746,9.944 123.932,8.758 124.094,8.758 R23.2@124.448,8.404 ; R23.2@124.448,8.455 124.471,8.477 126.696,8.477 TP37.1@126.718,8.5
NetR25_2: R25.2 U5.5 | length 5.1
  Bottom Layer w0.6: R25.2@107.466,37.2 107.769,36.897 107.769,37.023 108.072,37.326 U5.5@112.204,37.326
NetR26_2: R26.2 U7.5 | length 4.5
  Bottom Layer w0.5: R26.2@107.769,112.987 107.85,112.905 R26.2@107.932,112.824
  Bottom Layer w0.6: R26.2@107.932,112.824 U7.5@112.204,112.824
NetR34_1: R34.1 U8.7 | length 4.6
  Bottom Layer w0.6: R34.1@107.872,10.435 108.956,10.435 109.447,9.944 U8.7@112.204,9.944 ; U8.7@112.461,9.944 U8.7@112.518,9.944
NetR37_2: R37.2 TP38.1 U4.39 U7.2 | length 75.2
  Top Layer w0.3: TP38.1@126.718,117.025 138.974,129.281 161.112,129.281 161.386,129.555 161.39,129.555 161.56,129.725 v1(161.668,129.725)
  Bottom Layer w0.3: v1(161.668,129.725) 172.8,129.725 174.109,128.417 182.356,128.417 U4.39@183.645,127.127
  Bottom Layer w0.6: U7.2@117.232,115.364 123.258,115.364 124.039,114.583 124.039,114.432 124.342,114.129 R37.2@124.644,114.129 ; R37.2@124.493,114.129 R37.2@124.644,114.129 ; TP38.1@126.718,117.025 126.718,116.795 125.754,115.831 125.754,115.39 124.947,114.583 124.947,114.432 R37.2@124.644,114.129
NetR38_1: R38.1 R39.1 U4.10 | length 77.6
  Top Layer w0.5: v1(201.575,152.8) 217.3,168.525 217.3,177.555 v1(226.374,186.629)
  Bottom Layer w0.3: U4.10@192.13,127.127 195.379,130.375 197.418,130.375 201.575,134.532 v1(201.575,152.8)
  Bottom Layer w0.5: R39.1@226.374,185.375 R38.1@226.374,188.125
NetR43_1: R43.1 U9.7 | length 3.8
  Bottom Layer w0.6: R43.1@107.796,86.738 107.803,86.738 107.918,86.622 107.918,86.616 108.923,85.611 U9.7@111.133,85.611
NetR44_1: R44.1 U10.7 | length 5.5
  Bottom Layer w0.6: R44.1@107.768,193.206 107.768,193.056 107.918,192.906 108.491,192.906 110.026,191.371 U10.7@112.383,191.371
NetR45_2: R45.2 U8.5 | length 4.9
  Bottom Layer w0.5: R45.2@107.743,7.26 107.887,7.404 U8.5@112.204,7.404 U8.5@112.461,7.404 ; R45.2@107.769,7.26 R45.2@107.828,7.201
NetR46_2: R46.2 TP51.1 U4.30 U9.2 | length 97.4
  Top Layer w0.3: v3@126.719,84.3 129.619,81.4 142.65,81.4 TP51.1@145.256,81.4 v1(151.693,81.4)
  Bottom Layer w0.3: v1(151.693,81.4) 151.25,81.843 151.25,99.275 165.469,113.494 173.093,113.494 175.424,115.825 178.707,115.825 180.875,117.993 U4.30@185.059,122.177
  Bottom Layer w0.6: U9.2@117.232,85.611 123.389,85.611 R46.2@124.699,84.3 ; R46.2@124.85,84.3 v3(126.718,84.301)
NetR47_2: R47.2 R80.2 U4.21 U9.3 U11.3 | length 144.6
  Top Layer w0.3: v3(120,80.35) 120.009,80.359 120.009,84.416 121.093,85.5 158.375,85.5 v1(158.45,85.425) ; v1(120.039,55.865) 120.08,55.906 120.08,64.794 v3(120.121,64.835) ; v1(192.25,109.97) 196.301,114.021 196.301,114.439 v1(196.377,114.516)
  Bottom Layer w0.3: v3(120,80.35) 120.06,80.29 120.06,64.895 v3(120.121,64.835) ; v1(158.45,85.425) 158.4,85.475 158.4,96.625 165.75,103.975 187.518,103.975 190.568,107.025 190.568,107.695 192.173,109.3 192.173,109.893 v1(192.25,109.97) ; U4.21@190.009,121.47 192.558,118.921 192.558,118.868 194.905,116.521 194.905,115.988 v1(196.377,114.516)
  Bottom Layer w0.6: U9.3@116.161,84.341 U9.3@117.232,84.341 119.88,84.341 119.964,84.425 v1(120.018,84.425) 120.072,84.425 120.176,84.321 121.83,84.321 R47.2@121.85,84.301 ; U11.3@117.232,55.865 v1(120.039,55.865) 120.056,55.882 121.276,55.882 R80.2@121.293,55.9
NetR49_2: R49.2 TP52.1 U4.29 U10.2 | length 123.6
  Top Layer w0.3: TP52.1@126.9,185.7 128.725,183.875 133.4,183.875 139.822,177.453 143.697,177.453 147.8,173.35 147.8,167.7 172.868,142.632 172.868,117.075 v1(176.329,113.614)
  Bottom Layer w0.3: v1(176.329,113.614) 177.204,113.614 U4.29@185.413,121.824
  Bottom Layer w0.6: U10.2@117.232,191.371 123.354,191.371 R49.2@124.497,190.228 ; R49.2@124.768,190.001 124.918,189.851 126.049,189.851 126.9,189 TP52.1@126.9,185.7